# Altium PCB bdcmc25_revised.PcbDoc (part 2 of 4)
Units mil, origin at the board's own origin, x right, y up, seen from the top; angles counter-clockwise.
Board outline 7000 x 2750 mil, 4 copper layers (Top Layer, Layer 2 (GND), Layer 3 (GND), Bottom Layer), stack 23.756 mil thick; 347 components, 158 nets, 1046 pads, 1117 vias.
Unrouted connection lines stored in the file: 6.
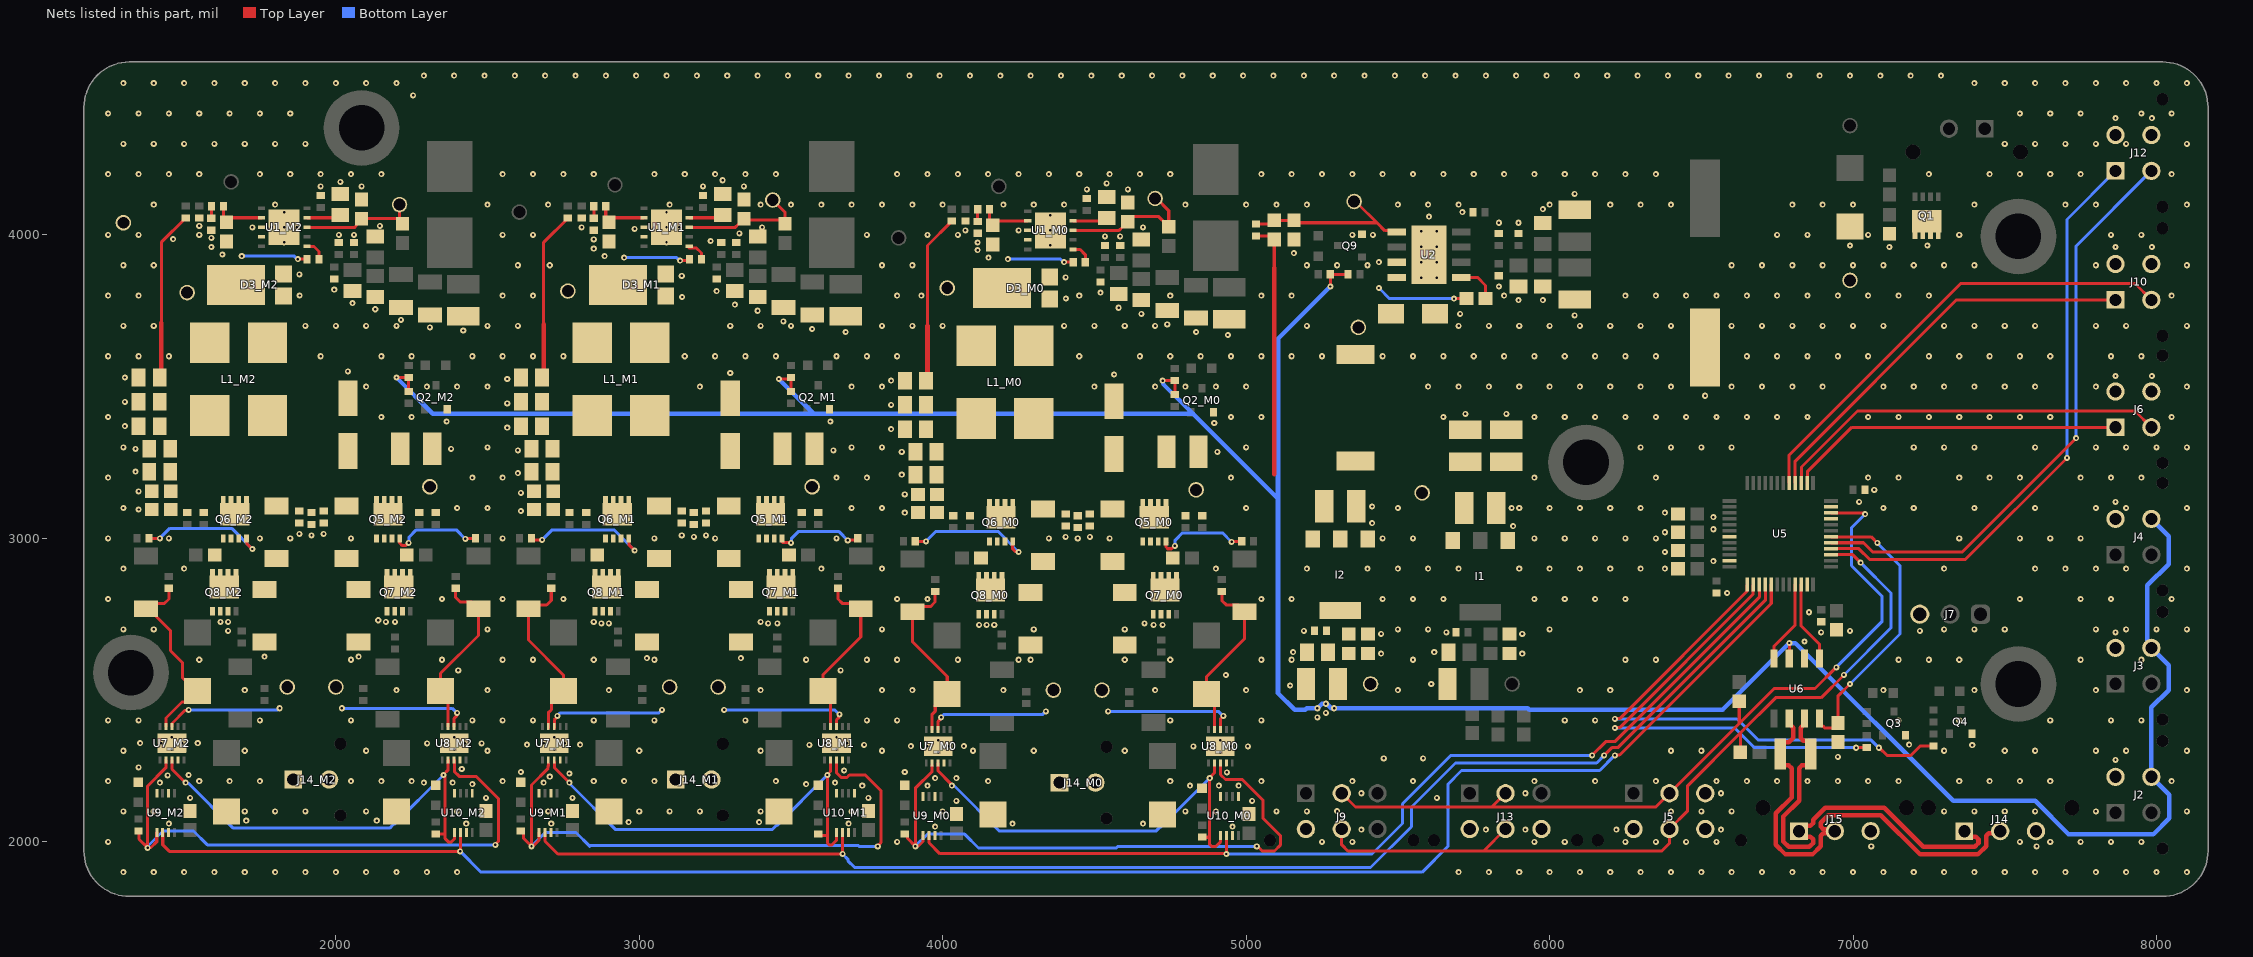
[diagram p4: the nets of this part, all layers, seen from the top]

## Part data
3V3 5V 7V GND GND TP3_M0 TP3_M1 TP3_M2 TP8 TP8 TP8_M2 TP9 TP9 TP9_M2 VBAT: library part TEST-POINT-0001, "Oranange PC Test Point, Miniature Phoisphor Bronze Silver Plating Through Hole Mounting Type"
C1: library part CAP-100U-0001, "CAP ALUM 100UF 20% 100V SMD", Capacitance="100 uF", Voltage=100V, ComponentLink1Description=Datasheet, ComponentLink1URL=https://industrial.panasonic.com/cdbs/www-data/pdf/RDE0000/ABA0000C1190.pdf, Device Class=Electrolytic
C2 C9_M0 C9_M1 C9_M2 C16_M0 C16_M1 C16_M2 C33: library part CAP-10U-0002, "CAP CER 10UF 50V X7R 1210", Capacitance="10 uF", Voltage=50V, ComponentLink1Description=Datasheet, ComponentLink1URL=https://mm.digikey.com/Volume0/opasdata/d220001/medias/docus/41/CL32B106KBJNNNE_Spec.pdf, Device Class=Ceramic, Size=1210
C3 C10_M0 C10_M1 C10_M2 C17_M0 C17_M1 C17_M2 C56_M0 C56_M1 C56_M2 C57_M0 C57_M1 C57_M2: library part CAP-1U-0001, "CAP CER 1UF 50V X7R 0805", Capacitance="1.0 uF", Voltage="50 V", ComponentLink2Description=Datasheet, ComponentLink2URL=https://www.yageo.com/upload/media/product/productsearch/datasheet/mlcc/UPY-GPHC_X7R_6.3V-to-250V_24.pdf, Device Class=Ceramic, Size=0805
C4 C11_M0 C11_M1 C11_M2 C18_M0 C18_M1 C18_M2: library part CAP-0.1U-0002, "CAP CER 0.1UF 50V X7R 0805", Capacitance="100 nF", Voltage Rating="50 V", ComponentLink2Description=Datasheet, ComponentLink2URL=https://www.yageo.com/upload/media/product/productsearch/datasheet/mlcc/UPY-GPHC_X7R_6.3V-to-250V_24.pdf, Device Class=Ceramic, Size=0805
C5 C12_M0 C12_M1 C12_M2 C19_M0 C19_M1 C19_M2: library part CAP-10N-0001, "CAP CER 10000PF 50V C0G/NP0 0805", Capacitance=10nF, Voltage=50V, ComponentLink1Description=Datasheet, ComponentLink1URL=https://search.murata.co.jp/Ceramy/image/img/A01X/G101/ENG/GRM2195C1H103JA01-01.pdf, Device Class=Ceramic, Size=0805
C6 C15_M0 C15_M1 C15_M2 C20_M0 C20_M1 C20_M2 C62_M0 C62_M1 C62_M2 C63_M0 C63_M1 C63_M2: library part CAP-1N-0001, "CAP CER 1000PF 50V X7R 0402", Capacitance="1.0 nF", Voltage="50 V", ComponentLink2Description=Datasheet, ComponentLink2URL=http://www.yageo.com/documents/recent/UPY-GP_NP0_16V-to-50V_16.pdf, Device Class=Ceramic, Size=0402
C7 C13_M0 C13_M1 C13_M2 C21_M0 C21_M1 C21_M2: library part CAP-100P-0001, "CAP CER 100PF 50V C0G/NPO 0402", Capacitance="100 pF", Voltage=50V, ComponentLink1Description=Datasheet, ComponentLink1URL=https://www.yageo.com/upload/media/product/productsearch/datasheet/mlcc/UPY-GP_NP0_16V-to-50V_18.pdf, Device Class=Ceramic, Size=0402
C8 C14_M0 C14_M1 C14_M2 C22_M0 C22_M1 C22_M2: library part CAP-10P-0001, "CAP CER 10PF 50V C0G/NPO 0402", Capacitance="10 pF", Voltage=50V, ComponentLink1Description=Datasheet, ComponentLink1URL=https://www.yageo.com/upload/media/product/productsearch/datasheet/mlcc/UPY-GP_NP0_16V-to-50V_18.pdf, Device Class=Ceramic, Size=0402
C23_M0 C23_M1 C23_M2 C32 C40 C48 C49 C50: library part CAP-0.1U-0001, "CAP CER 0.1UF 16V X7R 0402", Capacitance="100 nF", Voltage Rating="16 V", ComponentLink2Description=Datasheet, ComponentLink2URL=https://www.yageo.com/upload/media/product/productsearch/datasheet/mlcc/UPY-GPHC_X7R_6.3V-to-250V_24.pdf, Device Class=Ceramic, Size=0402
C24_M0 C24_M1 C24_M2 C25_M0 C25_M1 C25_M2: library part CAP-2.2U-0001, "CAP CER 2.2UF 100V X7R 1206", Capacitance=2.2uF, Voltage=100V, ComponentLink1Description=Datasheet, ComponentLink1URL=https://www.yageo.com/upload/media/product/productsearch/datasheet/mlcc/UPY-GPHC_X7R_6.3V-to-250V_24.pdf, Device Class=Ceramic, Size=1206
C26_M0 C26_M1 C26_M2: library part CAP-47U-0001, "CAP ALUM POLY 47UF 20% 16V SMD", Capacitance="47 uF", Voltage=16V, ComponentLink1Description=Datasheet, ComponentLink1URL=https://industrial.panasonic.com/cdbs/www-data/pdf/AAB8000/AAB8000C175.pdf, Device Class=Electrolytic
C27_M0 C27_M1 C27_M2: library part CAP-2.7N-0001, "CAP CER 2700PF 50V C0G/NP0 0805", Capacitance=2.7nF, Voltage=50V, ComponentLink1Description=Datasheet, ComponentLink1URL=https://search.murata.co.jp/Ceramy/image/img/A01X/G101/ENG/GRM2165C1H272JA01-01.pdf, Device Class=Ceramic, Size=0805
C28_M0 C28_M1 C28_M2: library part CAP-6.8P-0001, "CAP CER 6.8PF 100V C0G/NPO 0603", Capacitance=6.8pF, Voltage=100V, ComponentLink1Description=Datasheet, ComponentLink1URL=https://www.yageo.com/upload/media/product/productsearch/datasheet/mlcc/UPY-GPHC_X7R_6.3V-to-250V_24.pdf, Device Class=Ceramic, Size=0603
C29_M0 C29_M1 C29_M2: library part CAP-510P-0001, "CAP CER 510PF 50V C0G/NP0 0402", Capacitance="510 pF", Voltage="50 V", ComponentLink2Description=Datasheet, ComponentLink2URL=https://www.mouser.com/ProductDetail/Walsin/0402N511J500CT?qs=u16ybLDytRbq33ukPPRl4A%3D%3D&srsltid=AfmBOoq1-HCbTRqPV3GtwyI6lHLBf095DSA3Qg1Qkiix4a-obr82TmJ6, Device Class=Ceramic, Size=0402
C30 C35 C42 C60_M0 C60_M1 C60_M2 C61_M0 C61_M1 C61_M2 C64_M0 C64_M1 C64_M2 C65_M0 C65_M1 C65_M2: library part CAP-100N-0001, "CAP CER 0.1UF 100V X7R 0603", Capacitance="100 nF", Voltage="100 V", ComponentLink1Description=Datasheet, ComponentLink1URL=https://www.yageo.com/upload/media/product/app/datasheet/mlcc/upy-np0x7r_mv_100-to-630v.pdf, Device Class=Ceramic, Size=0603
C31 C39: library part CAP-10U-0001, "CAP CER 10UF 10V X5R 0603", Capacitance="10 uF", Voltage=10V, ComponentLink1Description=Datasheet, ComponentLink1URL=https://www.yageo.com/upload/media/product/app/datasheet/mlcc/upy-gphc_x5r_4v-to-50v.pdf, Device Class=Ceramic, Size=0603
C34 C41: library part CAP-470P-0001, "CAP CER 470PF 50V C0G/NPO 0805", Capacitance="470 pF", Voltage=50V, ComponentLink1Description=Datasheet, ComponentLink1URL=https://www.yageo.com/upload/media/product/productsearch/datasheet/mlcc/UPY-GP_NP0_16V-to-50V_18.pdf, Device Class=Ceramic, Size=0805
C36: library part CAP-390P-0001_1, "CAP CER 390PF 50V X7R 0402", Capacitance="390 pF", Voltage=50V, ComponentLink1Description=Datasheet, ComponentLink1URL=https://www.lcsc.com/datasheet/lcsc_datasheet_1912111437_Murata-Electronics-GRM155R71H391KA01D_C185563.pdf, Device Class=Ceramic, Size=0402
C37 C38: library part CAP-68U-0001, "CAP CER 68UF 10V X5R 2220", Capacitance="68 uF", Voltage=10V, ComponentLink1Description=Datasheet, ComponentLink1URL=https://www.lcsc.com/datasheet/lcsc_datasheet_2304140030_TDK-C5750X5R1A686MT000N_C342299.pdf, Device Class=Ceramic, Size=2220
C43 C44 C45 C46: library part CAP-10U-0003, "CAP TANT 10UF 10% 16V 1206", Capacitance="10 uF", Voltage=16V, ComponentLink1Description=Datasheet, ComponentLink1URL=https://www.lcsc.com/datasheet/lcsc_datasheet_2304140030_Vishay-Intertech-293D106X9016A2TE3_C110038.pdf, Device Class=Tantalum, Size=1206
C51: library part CAP-4.7U-0001, "CAP CER 4.7UF 25V X5R 0603", Capacitance="4.7 uF", Voltage=25V, Device Class=Ceramic, Size=0603
C52 C54 C58_M0 C58_M1 C58_M2 C59_M0 C59_M1 C59_M2: library part CAP-10N-0002, "CAP CER 10000PF 50V X7R 0603", Capacitance="10 nF", Voltage="50 V", ComponentLink2Description=Datasheet, ComponentLink2URL=http://www.yageo.com/documents/recent/UPY-GPHC_X7R_6.3V-to-50V_18.pdf, Device Class=Ceramic, Size=0603
C53 C55: library part CAP-1U-0002, "CAP CER 1UF 16V X7R 0603", Capacitance="1.0 uF", Voltage=16V, Device Class=Ceramic, Size=0603
D1: library part DIO-TVS-0001, "TVS DIODE 40VWM 64.5VC DO214AA", Current Rating=9.3A, Voltage Rating=64.5V, ComponentLink1Description=Datasheet, ComponentLink1URL=https://www.littelfuse.com/media?resourcetype=datasheets&itemid=09a6ae9a-73cb-4ac4-acac-e6dab92ab953&filename=littelfuse_tvs_diode_smbj_datasheet.pdf
D2_M0 D2_M1 D2_M2 D4 D5 D18_M0 D18_M1 D18_M2 D19_M0 D19_M1 D19_M2 D21: library part LED-0001, "LED YELLOW CLEAR 0603 SMD", Forward Current=30mA, Forward Voltage=2V, ComponentLink1Description=Datasheet, ComponentLink1URL=https://www.americanbrightled.com/pdffiles/led-components/smt/BL-HKC36G-AV-TRB.pdf
D3_M0 D3_M1 D3_M2: library part DIO-SCHOTTKY-0001, "DIODE SCHOTTKY 60V 7A POWERDI5", Forward Current=7A, Reverse Voltage (DC)=60V, ComponentLink1Description=Datasheet, ComponentLink1URL=https://www.diodes.com/assets/Datasheets/PDS760.pdf
D6_M0 D6_M1 D6_M2 D7_M0 D7_M1 D7_M2 D8_M0 D8_M1 D8_M2 D9_M0 D9_M1 D9_M2 D10_M0 D10_M1 D10_M2 D11_M0 D11_M1 D11_M2 D16_M0 D16_M1 D16_M2 D17_M0 D17_M1 D17_M2: library part DIO-SCHOTTKY-0003, "DIODE SCHOTTKY 60V 3A SOD128", Current Rating=3A, Reverse Voltage=60V, ComponentLink1Description=Datasheet, ComponentLink1URL=https://assets.nexperia.com/documents/data-sheet/PMEG6030EP.pdf
D12_M0 D12_M1 D12_M2 D13_M0 D13_M1 D13_M2 D14_M0 D14_M1 D14_M2 D15_M0 D15_M1 D15_M2: library part DIO-TVS-0002, "TVS DIODE 12VWM 19.9VC DO214AA", Current Rating=30.2A, Standoff Voltage=12V, ComponentLink1Description=Datasheet, ComponentLink1URL=https://www.littelfuse.com/media?resourcetype=datasheets&itemid=09a6ae9a-73cb-4ac4-acac-e6dab92ab953&filename=littelfuse_tvs_diode_smbj_datasheet.pdf
D20: library part DIO-SCHOTTKY-0004, "DIODE SCHOTTKY 200V 1A SMA", Current Rating=1A, Reverse Voltage=200V, ComponentLink1Description=Datasheet, ComponentLink1URL=https://www.digikey.com/en/products/detail/mdd/ss1200/15911596
F1_M0 F1_M1 F1_M2: library part FUSE-0001, "FUSE BLOK CARTRIDGE 125V 10A SMD", Fuse Current=8A, Voltage Rating=125V, ComponentLink2Description=Datasheet, ComponentLink2URL=https://www.littelfuse.com/~/media/electronics/datasheets/fuses/littelfuse_fuse_154_154t_154l_154tl_datasheet.pdf.pdf
F2 F3 F4: library part FUSE-0002, "FUSE BRD MT 250MA 32VAC 32VDC", Fuse Current=250mA, Voltage Rating=32V, ComponentLink2Description=Datasheet, ComponentLink2URL=https://www.littelfuse.com/media?resourcetype=datasheets&itemid=4a59f034-1cca-460e-a5ba-e1e66247c76d&filename=littelfuse_fuse_467_datasheet.pdf
I1: library part IC_LDO_3V3_0001, "IC REG LIN 3.3V 800MA SOT223-4", ComponentLink1Description="New link", ComponentLink1URL=https://www.ti.com/lit/ds/symlink/lm1117.pdf?HQS=dis-dk-null-digikeymode-dsf-pf-null-wwe&ts=1721700739746
I2: library part IC_LDO_5V_0001, "IC REG LINEAR 5V 800MA SOT223-4", ComponentLink1Description=Datasheet, ComponentLink1URL=https://www.ti.com/lit/ds/symlink/lm1117.pdf?HQS=dis-dk-null-digikeymode-dsf-pf-null-wwe&ts=1721700739746
J1: library part CONN-2POS-0002, "CONN HEADER VERT 2POS 3MM", ComponentLink1Description=Datasheet, ComponentLink1URL=https://www.molex.com/content/dam/molex/molex-dot-com/products/automated/en-us/salesdrawingpdf/436/43650/436500215_sd.pdf?inline
J2 J3 J4 J6 J10 J12: library part CONN-4POS-0002, "CONN HEADER VERT 4POS 3MM", ComponentLink1Description=Datasheet, ComponentLink1URL=https://www.molex.com/content/dam/molex/molex-dot-com/products/automated/en-us/salesdrawingpdf/430/43045/430450412_sd.pdf?inline
J5 J9 J13: library part CONN-6POS-0001, "CONN HEADER VERT 6POS 3MM", ComponentLink1Description=Datasheet, ComponentLink1URL=https://tools.molex.com/pdm_docs/ps/PS-43045.pdf
J7: library part CONN-3POS-0001, "CONN HEADER VERT 3POS 2.54MM", Current Rating=3A, Voltage Rating=250V, ComponentLink1Description=Datasheet, ComponentLink1URL=https://www.we-online.com/components/products/datasheet/61300311121.pdf
J14 J15: library part "Micro-Fit Molex 3 Pin Vertical", Package=43650-0315, DeviceName=43650-0315, DeviceSetName=HEADER_POS3_?, GateName_1=G$1, LibraryName=con-molex-micro-fit-3_0_2, SymbolName_1=HEADER_POS3
J14_M0 J14_M1 J14_M2: library part CONN-2POS-0001, "CONN HEADER VERT 2POS", ComponentLink1Description=Datasheet, ComponentLink1URL=https://tools.molex.com/pdm_docs/ps/PS-43045.pdf
L1_M0 L1_M1 L1_M2: library part IND-15U-0002-NoJLC, "SMD MOLDING POWER CHOKE", Current Rating=6A, Inductance=15uH, ComponentLink1Description=Datasheet, ComponentLink1URL=https://www.digikey.com/en/products/detail/codaca/CSAD1010-150M/16633512?s=N4IgjCBcoBwAxVAYygMwIYBsDOBTANCAPZQDaIALHAExwDMEAuoQA4AuUIAymwE4CWAOwDmIAL6Ew1MAE5EIFJAw4CxMiGoy6AdmoUQhajGqa6BjTDp6zhywFY4c23UtOLFbVXPVtYK3e9dODsbdwA2OxgQZhB2Th4BEXFJTQhoBTQsPEISSHITS0do1g5Ibj4hUQkNOBhteTiygFVBfjYAeVQAWVx0bABXXlxzfs4AVoAJcwBbIU4wAMJp9AAPeYDq2hgo9MaQFrbOnr7B4cJRsoBBGbmyuwA6DcIAWmp5RT5%2B1VzyAMYxAFAA
L2: library part IND-15U-0001-NoJLC, "FIXED IND 15UH 3.1A 50 MOHM SMD", Current Rating=3.1A, Inductance=15uH, ComponentLink1Description=Datasheet, ComponentLink1URL=https://www.eaton.com/content/dam/eaton/products/electronic-components/resources/data-sheet/eaton-dr1040-shielded-power-inductors-data-sheet.pdf
Q1: library part NMOS-60A-0001, "MOSFET N-CH 60V 12A/60A 8VSON", Continuous Current=60A, Voltage=60V, ComponentLink2Description=Datasheet, ComponentLink2URL=http://www.ti.com/lit/ds/symlink/csd18543q3a.pdf
Q2_M0 Q2_M1 Q2_M2 Q3 Q4 Q9: library part NMOS-200MA-0001, "MOSFET N-CH 60V 200MA SOT23", Continuous Current=200mA, Voltage=60V, ComponentLink1Description=Datasheet, ComponentLink1URL=https://toshiba.semicon-storage.com/info/T2N7002AK_datasheet_en_20150401.pdf?did=29712&prodName=T2N7002AK
Q5_M0 Q5_M1 Q5_M2 Q6_M0 Q6_M1 Q6_M2 Q7_M0 Q7_M1 Q7_M2 Q8_M0 Q8_M1 Q8_M2: library part NMOS-26A-0001, "MOSFET N-CH 30V 60A 8VSON", Continuous Current=60A, Voltage=30V, ComponentLink1Description=Datasheet, ComponentLink1URL=https://www.ti.com/lit/ds/symlink/csd17575q3.pdf?ts=1728565072242&ref_url=https%253A%252F%252Fwww.mouser.co.uk%252F
R1: library part RES-200k-0001, "RES SMD 200K OHM 1% 1/10W 0603", Power=100mW, Resistance=200k, Tolerance=1%, ComponentLink1Description=Datasheet, ComponentLink1URL=https://www.yageo.com/upload/media/product/products/datasheet/rchip/PYu-RC_Group_51_RoHS_L_12.pdf, Size=0603
R2 R6_M0 R6_M1 R6_M2 R11: library part RES-100k-0001, "RES SMD 100K OHM 1% 1/10W 0603", Power=100mW, Resistance=100k, Tolerance=1%, ComponentLink1Description=Datasheet, ComponentLink1URL=https://www.yageo.com/upload/media/product/products/datasheet/rchip/PYu-RC_Group_51_RoHS_L_12.pdf, Size=0603
R3_M0 R3_M1 R3_M2 R34: library part RES-240-0001, "240R 0.063W 1% 0402 (1005 Metric)  SMD", Power=1/16W, Resistance=240R, Tolerance=1%, ComponentLink1Description=Datasheet, ComponentLink1URL=https://www.yageo.com/upload/media/product/products/datasheet/rchip/PYu-RC_Group_51_RoHS_L_12.pdf, Size=0402
R4_M0 R4_M1 R4_M2: library part RES-2.15M-0001, "RES SMD 2.15M OHM 1% 1/10W 0603", Power=1/10W, Resistance=2.15M, Tolerance=1%, ComponentLink1Description=Datasheet, ComponentLink1URL=https://www.yageo.com/upload/media/product/products/datasheet/rchip/PYu-RC_Group_51_RoHS_L_12.pdf, Size=0603
R5_M0 R5_M1 R5_M2: library part RES-1k-0001, "RES 1K OHM 1% 1/16W 0402", Power=1/16W, Resistance=1k, Tolerance=1%, ComponentLink1Description=Datasheet, ComponentLink1URL=https://www.yageo.com/upload/media/product/products/datasheet/rchip/PYu-RC_Group_51_RoHS_L_12.pdf, Size=0402
R7_M0 R7_M1 R7_M2: library part RES-147k-0001, "RES 147K OHM 1% 1/16W 0402", Power=1/16W, Resistance=147k, Tolerance=1%, ComponentLink1Description=Datasheet, ComponentLink1URL=https://www.yageo.com/upload/media/product/products/datasheet/rchip/PYu-RC_Group_51_RoHS_L_12.pdf, Size=0402
R8_M0 R8_M1 R8_M2: library part RES-59k-0001, "RES 59K OHM 1% 1/16W 0402", Power=1/16W, Resistance=59k, Tolerance=1%, ComponentLink1Description=Datasheet, ComponentLink1URL=https://www.digikey.com/en/products/detail/yageo/RC0402FR-0759KL/2827634?s=N4IgTCBcDaIEoGEAMAWJYBicC0SDsArAJwDSAMiALoC%2BQA, Size=0402
R9_M0 R9_M1 R9_M2: library part RES-178k-0001, "62.5mW Thick Film Resistors 50V ±100ppm/℃ ±1% 178kΩ 0402 Chip Resistor - Surface Mount ROHS", Power=1/16W, Resistance=178k, Tolerance=1%, ComponentLink1Description=Datasheet, ComponentLink1URL=https://www.lcsc.com/datasheet/lcsc_datasheet_2304140030_RALEC-RTT021783FTH_C102842.pdf, Size=0402
R10_M0 R10_M1 R10_M2 R35: library part RES-10.5k-0001, "RES 10.5K OHM 1% 1/16W 0402", Power=1/16W, Resistance=10.5k, Tolerance=1%, ComponentLink1Description=Datasheet, ComponentLink1URL=https://www.yageo.com/upload/media/product/products/datasheet/rchip/PYu-RC_Group_51_RoHS_L_12.pdf, Size=0402
R12: library part RES-43.5k-0001, "RES 45.3K OHM 1% 1/16W 0402", Power=1/16W, Resistance=45.3k, Tolerance=1%, ComponentLink1Description=Datasheet, ComponentLink1URL=https://www.lcsc.com/datasheet/lcsc_datasheet_2304140030_YAGEO-RC0402FR-0745K3L_C137977.pdf, Size=0402
R13: library part RES-12k-0001, "RES 12K OHM 1% 1/10W 0603", Power=1/10W, Resistance=12k, Tolerance=1%, ComponentLink1Description=Datasheet, ComponentLink1URL=https://www.lcsc.com/datasheet/lcsc_datasheet_2304140030_YAGEO-RC0603FR-0712KL_C114659.pdf, Size=0603
R14 R15 R20: library part RES-4.7k-0001, "RES 4.7K OHM 1% 1/10W 0603", Power=1/10W, Resistance=4.7k, Tolerance=1%, ComponentLink1Description=Datasheet, ComponentLink1URL=https://www.yageo.com/upload/media/product/products/datasheet/rchip/PYu-RC_Group_51_RoHS_L_12.pdf, Size=0603
R16 R17: library part RES-470-0001, "RES 470 OHM 1% 1/16W 0402", Power=1/16W, Resistance=470R, Tolerance=1%, ComponentLink1Description=Datasheet, ComponentLink1URL=https://www.yageo.com/upload/media/product/products/datasheet/rchip/PYu-RC_Group_51_RoHS_L_12.pdf, Size=0402
R18 R19 R32_M0 R32_M1 R32_M2 R33_M0 R33_M1 R33_M2: library part RES-100-0001, "RES 100 OHM 1% 1/16W 0402", Power=1/16W, Resistance=100R, Tolerance=1%, ComponentLink1Description=Datasheet, ComponentLink1URL=https://www.yageo.com/upload/media/product/products/datasheet/rchip/PYu-RC_Group_51_RoHS_L_12.pdf, Size=0402
R21: library part RES-120-0001, "RES 120 OHM 1% 1/2W 1210", Power=1/2W, Resistance=120R, Tolerance=1%, ComponentLink1Description=Datasheet, ComponentLink1URL=https://www.yageo.com/upload/media/product/products/datasheet/rchip/PYu-RC_Group_51_RoHS_L_12.pdf, Size=1210
R22_M0 R22_M1 R22_M2 R23_M0 R23_M1 R23_M2 R24_M0 R24_M1 R24_M2 R25_M0 R25_M1 R25_M2 R28_M0 R28_M1 R28_M2 R29_M0 R29_M1 R29_M2 R30_M0 R30_M1 R30_M2 R31_M0 R31_M1 R31_M2: library part RES-33-0001, "RES 33 OHM 1% 1/8W 0402", Power=1/8W, Resistance=33R, Tolerance=1%, ComponentLink1Description=Datasheet, ComponentLink1URL=https://www.yageo.com/upload/media/product/products/datasheet/rchip/PYu-RC_Group_51_RoHS_L_12.pdf, Size=0402
R26_M0 R26_M1 R26_M2 R27_M0 R27_M1 R27_M2: library part RES-1-0001, "RES SMD 1 OHM 5% 1/10W 0402", Power=1/10W, Resistance=1.0R, Tolerance=5%, ComponentLink1Description=Datasheet, ComponentLink1URL=https://api.pim.na.industrial.panasonic.com/file_stream/main/fileversion/1242, Size=0402
U1_M0 U1_M1 U1_M2: library part IC-BUCK-0001, "IC REG BUCK ADJ 5A 10WSON", ComponentLink1Description=Datasheet, ComponentLink1URL=https://www.ti.com/general/docs/suppproductinfo.tsp?distId=10&gotoUrl=https%3A%2F%2Fwww.ti.com%2Flit%2Fgpn%2Ftps54561
U2: library part IC_BUCK_7V_0001, "IC REG BUCK ADJ 2A 8SOPWR", ComponentLink1Description=Datasheet, ComponentLink1URL=https://www.ti.com/general/docs/suppproductinfo.tsp?distId=10&gotoUrl=https%3A%2F%2Fwww.ti.com%2Flit%2Fgpn%2Flmr16020
U5: library part IC-STM32G431CBT6, "IC MCU 32BIT 128KB FLASH 48LQFP", Package=48LQFP, ComponentLink1Description=Datasheet, ComponentLink1URL=https://www.st.com/resource/en/datasheet/stm32g431cb.pdf
U6: library part IC-CAN-0001, "IC TRANSCEIVER 1/1 8SOIC", ComponentLink1Description=Datasheet, ComponentLink1URL=https://www.ti.com/lit/ds/symlink/tcan1044-q1.pdf?HQS=dis-dk-null-digikeymode-dsf-pf-null-wwe&ts=1728758303289&ref_url=https%253A%252F%252Fwww.ti.com%252Fgeneral%252Fdocs%252Fsuppproductinfo.tsp%253FdistId%253D10%2526gotoUrl%253Dhttps%253A%252F%252Fwww.ti.com%252Flit%252Fgpn%252Ftcan1044-q1
U7_M0 U7_M1 U7_M2 U8_M0 U8_M1 U8_M2: library part IC-GTDR-0001, "IC GATE DRVR HALF-BRIDGE 10VSON", Package=10-VSON, ComponentLink1Description=Datasheet, ComponentLink1URL=https://www.ti.com/lit/ds/symlink/ucc27282.pdf?HQS=dis-dk-null-digikeymode-dsf-pf-null-wwe&ts=1728563165008&ref_url=https%253A%252F%252Fwww.ti.com, VCC Max=16
U9_M0 U9_M1 U9_M2 U10_M0 U10_M1 U10_M2: library part IC-MUX-0001, "Multiplexer 1 x 2:1 8-VSSOP", ComponentLink1Description=Datasheet, ComponentLink1URL=https://www.ti.com/general/docs/suppproductinfo.tsp?distId=10&gotoUrl=https%3A%2F%2Fwww.ti.com%2Flit%2Fgpn%2Fsn74lvc2g157

## Free pads (board coordinates)
  round 250 hole 150: ""(1325,2557.5) ""(2085,4352.5) ""(6120,3250) ""(7545,2520) ""(7545,3995)

## Via types
v1: diameter 20, hole 8, Top Layer to Bottom Layer, 1102 vias
v2: diameter 20, hole 7.87, Top Layer to Bottom Layer, 15 vias

## Nets (pads, with @x,y where several pads share a name; then routed paths per layer and width w, separated by ;. In a path a pad name is that pad's centre, name@x,y a point inside that pad or via, vN(x,y) a via of type N, cw(c..) or ccw(c..) an arc to the next point about the centre after c; other vN are vias at no path point)
3V3: 
5V: 5V.1 C39.2 C40.2 C41.2 C42.2 C46.2 I2.2 I2.4 J2.4 J3.4 J4.4 R3_M0.2 R3_M1.2 R3_M2.2 R5_M0.2 R5_M1.2 R5_M2.2 R34.2 R35.2 U6.3 | length 9662.5
  Top Layer w10: v1(2200,3530) R3_M2.2@2240,3530 R5_M2.2@2240,3484.37 ; v1(3460,3525) 3500,3525 R5_M1.2@3500,3484.37 R5_M1.2@3500,3479.37 ; v1(4725,3520) R3_M0.2@4765,3520 R5_M0.2@4765,3474.37 ; v1(5277.59,3830) 5277.43,3830.16 5277.43,3869.84 R34.2@5277.27,3870 R35.2@5327.9,3870 ; U6.3@6790,2603.43 v1(6790,2655)
  Bottom Layer w10: v1(4725,3520) 4726.15,3518.85 4726.15,3508.85
  Bottom Layer w15: v1(2200,3530) 2320,3410 3575,3410 ; v1(3460,3525) 3575,3410 ; 4726.15,3508.85 4825,3410 ; v1(5277.59,3830) 5105,3657.41 5105,3130 ; J4.4@7983.11,3064.06 8040,3007.17 8040,2915 7970,2845 7970,2664.41 7983.11,2651.3 J3.4@7983.11,2639.06 8040,2582.17 8040,2500 7983.11,2443.11 7983.11,2418.74 7982.7,2418.33 7982.7,2316.67 7983.11,2316.26 J2.4@7983.11,2214.06 8042.17,2155 8042.17,2077.17 7990,2025 7710,2025 7600,2135 7330,2135 6810,2655 v1(6790,2655) 6570,2435 5932.64,2435 5927.64,2440 v1(5290,2440) 5289.81,2440.19 5280.08,2440.19 5265.27,2455 5265,2455 5264.81,2454.81 5250.08,2454.81 5235.27,2440 5199.86,2440 5194.86,2435 5160,2435 5105,2490 5105,3130 ; 3575,3410 4825,3410 ; 4825,3410 5105,3130
  other v1: 5235,2410 5262.5,2425 5235,2440 5262.5,2455
7V_Buck: 7V.1 C36.1 C37.2 C38.2 C43.2 C45.2 I1.3 I2.3 L2.2 R11.2 | length 838.4
  Top Layer w10: C36.1@5032.59,3996.81 5080.78,3996.81 R11.2@5092.59,3985 5092.59,3892.41
  Top Layer w15: 5092.59,3211.46 5092.59,3892.41
12V_MOTOR_M0: C16_M0.2 C17_M0.2 C18_M0.2 C19_M0.2 C20_M0.2 C21_M0.2 C22_M0.2 C26_M0.2 C56_M0.2 C57_M0.1 C58_M0.2 C59_M0.1 C62_M0.1 C63_M0.2 D8_M0.2 D9_M0.2 L1_M0.2 Q5_M0.3 Q6_M0.3 R7_M0.2 R26_M0.2 R27_M0.2 TP3_M0.1 | length 534.4
  Top Layer w10: 3950,3700 3950,3965.32 R7_M0.2@4030,4045.32
  Top Layer w15: C17_M0.2@3950,3544.05 3950,3700
12V_MOTOR_M1: C16_M1.2 C17_M1.2 C18_M1.2 C19_M1.2 C20_M1.2 C21_M1.2 C22_M1.2 C26_M1.2 C56_M1.2 C57_M1.1 C58_M1.2 C59_M1.1 C62_M1.1 C63_M1.2 D8_M1.2 D9_M1.2 L1_M1.2 Q5_M1.3 Q6_M1.3 R7_M1.2 R26_M1.2 R27_M1.2 TP3_M1.1 | length 539.4
  Top Layer w10: 2685,3705 2685,3975.32 R7_M1.2@2765,4055.32
  Top Layer w15: C17_M1.2@2685,3549.05 2685,3705
12V_MOTOR_M2: C16_M2.2 C17_M2.2 C18_M2.2 C19_M2.2 C20_M2.2 C21_M2.2 C22_M2.2 C26_M2.2 C56_M2.2 C57_M2.1 C58_M2.2 C59_M2.1 C62_M2.1 C63_M2.2 D8_M2.2 D9_M2.2 L1_M2.2 Q5_M2.3 Q6_M2.3 R7_M2.2 R26_M2.2 R27_M2.2 TP3_M2.1 | length 534.4
  Top Layer w10: 1425,3710 1425,3975.32 R7_M2.2@1505,4055.32
  Top Layer w15: C17_M2.2@1425,3554.05 1425,3710
CAN_N: J14.P$2 J15.P$2 R21.2 U6.6 | length 1529.2
  Top Layer w15: U6.6@6790,2406.57 6790,2388.86 6802.5,2376.36 6802.5,2342.19 6788.71,2328.4 6771,2328.4 6759.8,2317.2 R21.2@6759.8,2290 6759.8,2262.8 6771,2251.6 6788.71,2251.6 6797.5,2242.81 6797.5,2146.01 6745.23,2093.74 6745.23,1990.55 6777.44,1958.34 6866.34,1958.34 6893.44,1985.45 6893.44,2019.57 6902.23,2028.35 6933.35,2028.35 J15.P$2@6940,2035 6933.35,2041.65 6902.23,2041.65 6893.44,2050.43 6893.44,2062.86 6918.2,2087.62 7091.92,2087.62 7221.2,1958.34 7411.34,1958.34 7438.44,1985.45 7438.44,2019.57 7447.23,2028.35 7478.35,2028.35 J14.P$2@7485,2035
CAN_P: J14.P$1 J15.P$1 R21.1 U6.7 | length 1428.2
  Top Layer w15: U6.7@6840,2406.57 6840,2388.86 6827.5,2376.36 6827.5,2342.18 6836.29,2333.4 6849,2333.4 6860.2,2322.2 R21.1@6860.2,2290 6860.2,2262.8 6849,2251.6 6831.29,2251.6 6822.5,2242.82 6822.5,2135.65 6770.23,2083.38 6770.23,2000.91 6787.8,1983.34 6855.98,1983.34 6868.44,1995.8 6868.44,2008.23 6859.66,2017.01 6839.88,2017.01 J15.P$1@6821.89,2035 6839.88,2052.99 6859.66,2052.99 6868.44,2061.77 6868.44,2073.22 6907.85,2112.62 7102.27,2112.62 7231.56,1983.34 7400.98,1983.34 7413.44,1995.8 7413.44,2008.23 7404.66,2017.01 7354.88,2017.01 J14.P$1@7351.89,2020
CAN_RX_LED: R17.2 U5.25 | length 1744.6
  Top Layer w10: v1(6215,2405) 6215.93,2405.93 6230.93,2405.93 6650.73,2825.73 6650.73,2846.68 U5.25@6651.73,2847.68 ; v1(7085,2310) 7086.62,2310 7111.62,2285 7190.71,2285 7220.87,2315.16 7264.84,2315.16 R17.2@7265,2315.32
  Bottom Layer w10: v1(6215,2405) 6618.35,2405 6688.35,2335 7060,2335 v1(7085,2310)
CAN_STB: R20.1 U5.42 U6.8 | length 960.9
  Top Layer w10: U6.8@6890,2406.57 6890,2388.86 6896.81,2382.05 6899.76,2382.05 6906.81,2375 6933.5,2375 R20.1@6950,2391.5 6950,2480 v1(6990,2520) ; U5.42@6927.4,3005.08 U5.42@6927.32,3005.16 7059.84,3005.16 v1(7080,2985)
  Bottom Layer w10: v1(6990,2520) 7155,2685 7155,2910 v1(7080,2985)
CAN_TX_LED: R16.2 U5.26 | length 1527.6
  Top Layer w10: v1(6215,2375) 6216.15,2376.15 6231.15,2376.15 6670.42,2815.42 6670.42,2846.68 U5.26@6671.42,2847.68 ; v1(7010,2310) 7010.16,2310.16 7044.84,2310.16 R16.2@7045,2310.32
  Bottom Layer w10: v1(6215,2375) 6610,2375 6675,2310 v1(7010,2310)
DIR_1_IN_M0: R32_M0.1 U7_M0.7 U8_M0.8 U9_M0.5 | length 2040.3
  Top Layer w10: R32_M0.1@3875,2025.32 3881.27,2025.32 3883.78,2022.8 3883.78,2011.22 v1(3910,1985) ; U9_M0.5@3935,2020.08 3934.92,2020 3934.92,2000.78 3920.29,1986.15 3911.15,1986.15 v1(3910,1985) ; U7_M0.7@3965.32,2253.07 3965.32,2231.96 3910,2176.65 v1(3910,1985) ; U8_M0.8@4915.63,2259.88 4915.63,2221.2 4931.83,2205 4987.53,2205 5055,2137.53 5055,2078.07 5113.7,2019.37 5113.7,1990.41 5093.25,1969.96 5052.75,1969.96 5037.71,1985 v1(5035,1985)
  Bottom Layer w10: v1(3910,1985) 3950,2025 4072.53,2025 4117.84,1979.68 4572.41,1979.68 4577.73,1985 v1(5035,1985)
DIR_1_IN_M1: R32_M1.1 U7_M1.7 U8_M1.8 U9_M1.5 | length 2002.1
  Top Layer w10: R32_M1.1@2616.81,2037.13 2618.78,2035.16 2618.78,2011.22 v1(2645,1985) 2646.15,1986.15 2651.15,1986.15 2670,2005 U9_M1.5@2670,2030.08 ; v1@2644.68,1985.32 2644.68,2187.21 2700,2242.53 2700,2249.43 2700.35,2249.79 2700.35,2258.07 ; U8_M1.8@3650,2264.88 3650.63,2264.88 3650.63,2226.84 3665.47,2212 3684.53,2212 3692.53,2220 3745,2220 3796.65,2168.35 3796.65,1997.28 3786,1986.62 v1(3786,1985)
  Bottom Layer w10: v1(2645,1985) 2690.32,2030.32 2791.4,2030.32 2836.72,1985 2839.4,1987.68 3721.94,1987.68 3724.63,1985 v1(3786,1985)
DIR_1_IN_M2: R32_M2.1 U7_M2.7 U8_M2.8 U9_M2.5 | length 2019.2
  Top Layer w10: R32_M2.1@1350,2035.32 1351.5,2033.82 1351.5,2008.5 v1(1380,1980) ; U9_M2.5@1410,2030.08 1410,2000 1391.15,1981.15 1381.15,1981.15 v1(1380,1980) ; U7_M2.7@1440.32,2269.88 1440.04,2269.61 1440.04,2243.59 1380,2183.55 v1(1380,1980) ; U8_M2.8@2390,2269.88 2390.63,2269.88 2390.63,2231.84 2406.72,2215.76 2461.77,2215.76 2536.65,2140.87 2536.65,2002.28 2526,1991.62 v1(2526,1990)
  Bottom Layer w10: v1(1380,1980) 1381.15,1981.15 1381.15,1986.15 1430.32,2035.32 1531.4,2035.32 1576.72,1990 v1(2526,1990)
DIR_2_IN_M0: R33_M0.1 U7_M0.8 U8_M0.7 U10_M0.5 | length 1435.7
  Top Layer w10: U7_M0.8@3985,2259.88 3985,2233.07 v1@4027,2191.07 ; R33_M0.1@4855,2015.32 4855.31,2015 4880,2015 ; U8_M0.7@4895.31,2259.88 4895.35,2259.84 4895.35,2226.98 4880,2211.62 v1(4880,2210) 4880,2015 ; U10_M0.5@4915,2020.08 4914.92,2020 4914.92,1998.9 4901.02,1985 4885.86,1985 4880,1990.86 4880,2015
  Bottom Layer w10: v1(4030,2185) 4031.15,2183.85 4038.67,2183.85 4187.53,2035 4702.47,2035 4715.47,2048 4718,2048 v1(4880,2210)
DIR_2_IN_M1: R33_M1.1 U7_M1.8 U8_M1.7 U10_M1.5 | length 1441.3
  Top Layer w10: U7_M1.8@2720,2263.07 2720,2245 v1(2770,2195) ; R33_M1.1@3590,2020.32 3620.32,2020.32 ; U8_M1.7@3630.32,2264.88 3630.63,2264.88 3630.63,2256.6 3630.35,2256.32 3630.35,2231.98 3620,2221.62 v1(3620,2220) 3620.32,2219.68 3620.32,2020.32 ; U10_M1.5@3650,2030.08 3650,2005 3634.47,1989.47 3626.18,1989.47 3620.32,1995.32 3620.32,2020.32
  Bottom Layer w10: v1@2770,2193.38 v1(2770,2195) ; v1@2773.67,2188.85 2922.53,2040 3437.47,2040 3450.47,2053 3453,2053 v1(3620,2220)
DIR_2_IN_M2: R33_M2.1 U7_M2.8 U8_M2.7 U10_M2.5 | length 1436.1
  Top Layer w10: U7_M2.8@1460,2269.88 1460,2239.52 v1@1504.76,2194.76 ; R33_M2.1@2330,2025.32 2360.32,2025.32 ; U8_M2.7@2370.32,2269.88 2370.63,2269.88 2370.63,2261.6 2370.35,2261.32 2370.35,2236.98 2355,2221.62 v1(2355,2220) 2355,2218.38 2360.32,2213.05 2360.32,2025.32 ; U10_M2.5@2390.63,2030 2390.55,2029.92 2390.55,2009.53 2381.02,2000 2370.65,2000 2360.32,2010.32 2360.32,2025.32
  Bottom Layer w10: v1(1505,2195) 1506.15,2193.85 1513.67,2193.85 1662.53,2045 2177.47,2045 2190.47,2058 2193,2058 v1(2355,2220)
EN_M0: EN_M0.1 R4_M0.1 R6_M0.2 U1_M0.3 | length 463.9
  Top Layer w10: U1_M0.3@4429.8,4015 4581.5,4015 4592.36,4025.87 4593.35,4025.87 4610,4042.52 R6_M0.2@4610,4043.5 4626.5,4060 4712.48,4060 4738,4034.48 4745,4027.48 R4_M0.1@4745,4026.5 4745,4080 4705,4120 EN_M0.1@4700,4120
EN_M1: EN_M1.1 R4_M1.1 R6_M1.2 U1_M1.3 | length 426.6
  Top Layer w10: U1_M1.3@3164.8,4025 3316.5,4025 3327.36,4035.87 3328.35,4035.87 3345,4052.52 R6_M1.2@3345,4053.5 ; R6_M1.2@3345,4048.5 R4_M1.1@3463.35,4048.5 ; EN_M1.1@3440,4115 3480,4075 R4_M1.1@3480,4036.5 3480,4037.48 R4_M1.1@3466.16,4051.32
EN_M2: EN_M2.1 R4_M2.1 R6_M2.2 U1_M2.3 | length 390.9
  Top Layer w10: U1_M2.3@1904.8,4025 2062.49,4025 2068.35,4030.86 2068.35,4036.85 R6_M2.2@2085,4053.5 2203.35,4053.5 R4_M2.1@2210,4046.85 ; EN_M2.1@2210,4100 R4_M2.1@2210,4046.85 ; R4_M2.1@2220,4036.5 2210,4046.5 R4_M2.1@2210,4046.85
FDCAN_RX: U5.33 U6.4 | length 272.9
  Top Layer w10: U6.4@6740,2603.43 6740,2645 6809.21,2714.21 U5.33@6809.21,2847.68
FDCAN_TX: U5.34 U6.1 | length 269.6
  Top Layer w10: U5.34@6828.9,2847.68 6828.9,2711.1 6890,2650 U6.1@6890,2603.43
GND: C1.1 C2.1 C3.1 C4.1 C5.1 C6.1 C7.1 C8.1 C9_M0.1 C9_M1.1 C9_M2.1 C10_M0.1 C10_M1.1 C10_M2.1 C11_M0.1 C11_M1.1 C11_M2.1 C12_M0.1 C12_M1.1 C12_M2.1 C13_M0.1 C13_M1.1 C13_M2.1 C14_M0.1 C14_M1.1 C14_M2.1 C15_M0.1 C15_M1.1 C15_M2.1 C16_M0.1 C16_M1.1 C16_M2.1 C17_M0.1 C17_M1.1 C17_M2.1 C18_M0.1 C18_M1.1 C18_M2.1 C19_M0.1 C19_M1.1 C19_M2.1 C20_M0.1 C20_M1.1 C20_M2.1 C21_M0.1 C21_M1.1 C21_M2.1 C22_M0.1 C22_M1.1 C22_M2.1 C24_M0.1 C24_M1.1 C24_M2.1 C25_M0.1 C25_M1.1 C25_M2.1 C26_M0.1 C26_M1.1 C26_M2.1 C27_M0.1 C27_M1.1 C27_M2.1 C28_M0.1 C28_M1.1 C28_M2.1 C29_M0.1 C29_M1.1 C29_M2.1 C31.1 C32.1 C33.1 C34.1 C35.1 C37.1 C38.1 C39.1 C40.1 C41.1 C42.1 C43.1 C44.1 C45.1 C46.1 C48.1 C49.1 C50.1 C51.1 C52.1 C53.1 C54.1 C55.1 C56_M0.1 C56_M1.1 C56_M2.1 C57_M0.2 C57_M1.2 C57_M2.2 C58_M0.1 C58_M1.1 C58_M2.1 C59_M0.2 C59_M1.2 C59_M2.2 C64_M0.2 C64_M1.2 C64_M2.2 C65_M0.2 C65_M1.2 C65_M2.2 D1.2 D3_M0.1 D3_M1.1 D3_M2.1 D12_M0.1 D12_M1.1 D12_M2.1 D15_M0.1 D15_M1.1 D15_M2.1 D16_M0.1 D16_M1.1 D16_M2.1 D17_M0.1 D17_M1.1 D17_M2.1 D18_M0.2 D18_M1.2 D18_M2.2 D19_M0.2 D19_M1.2 D19_M2.2 D20.1 GND.1@1300,4040 GND.1@6990,3850 I1.1 I2.1 J2.2 J3.2 J4.2 J5.3 J5.4 J5.6 J6.2 J6.4 J7.3 J9.4 J10.2 J10.4 J12.2 J12.4 J13.4 J13.6 J14.P$3 J15.P$3 Q1.3 Q2_M0.2 Q2_M1.2 Q2_M2.2 Q3.2 Q4.2 Q7_M0.2 Q7_M1.2 Q7_M2.2 Q8_M0.2 Q8_M1.2 Q8_M2.2 Q9.2 R2.2 R6_M0.1 R6_M1.1 R6_M2.1 R9_M0.1 R9_M1.1 R9_M2.1 R10_M0.1 R10_M1.1 R10_M2.1 R12.1 R13.1 R20.2 U1_M0.8 U1_M0.11 U1_M1.8 U1_M1.11 U1_M2.8 U1_M2.11 U2.7 U2.9 U5.19 U5.23 U5.35 U5.45 U5.47 U6.2 U7_M0.9 U7_M0.11 U7_M1.9 U7_M1.11 U7_M2.9 U7_M2.11 U8_M0.9 U8_M0.11 U8_M1.9 U8_M1.11 U8_M2.9 U8_M2.11 U9_M0.2 U9_M0.4 U9_M0.7 U9_M1.2 U9_M1.4 U9_M1.7 U9_M2.2 U9_M2.4 U9_M2.7 U10_M0.1 U10_M0.4 U10_M0.7 U10_M1.1 U10_M1.4 U10_M1.7 U10_M2.1 U10_M2.4 U10_M2.7
  other v1: 1300,1900 1400,1900 1500,1900 1600,1900 1700,1900 1800,1900 1900,1900 2000,1900 2100,1900 2200,1900 2300,1900 2400,1900 5700,1900 5800,1900 5900,1900 6000,1900 6100,1900 6200,1900 6300,1900 6400,1900 6500,1900 6600,1900 6700,1900 6800,1900 6900,1900 7000,1900 7100,1900 7200,1900 7300,1900 7400,1900 7500,1900 7600,1900 7700,1900 7800,1900 7900,1900 8000,1900 8100,1900 7060,1985 7605,1985 1250,2000 3850,2000 5250,2000 5350,2000 5950,2000 6050,2000 6250,2000 6350,2000 6450,2000 6550,2000 7550,2000 7650,2000 7750,2000 7850,2000 7950,2000 5380,2040 5790,2040 5920,2040 6220,2040 6565,2040 3975,2050 4955,2050 1450,2060 2430,2060 2710,2060 3690,2060 4230,2060 4660,2060 2965,2065 3395,2065 1705,2070 2135,2070 1300,2100 1400,2100 1700,2100 1800,2100 1900,2100 2100,2100 2400,2100 2700,2100 3000,2100 3100,2100 3200,2100 3400,2100 3700,2100 4000,2100 4800,2100 4900,2100 5100,2100 5200,2100 6400,2100 6500,2100 6600,2100 7300,2100 7400,2100 7500,2100 7600,2100 7800,2100 8100,2100 5300,2101.01 4045,2135 5020,2135 1520,2145 2495,2145 2780,2145 3755,2145 5628.46,2144.64 5380,2160 5920,2160 6565,2160 3735,2185 3950,2185 4815,2185 4910,2185 4975,2185 2450,2190 3550,2190 1420,2195 2290,2195 2385,2195 2685,2195 3645,2195 1250,2200 1550,2200 1650,2200 1750,2200 2050,2200 2150,2200 2250,2200 2550,2200 2850,2200 2950,2200 3050,2200 3450,2200 4150,2200 4750,2200 5050,2200 5350,2200 5550,2200 5950,2200 6150,2200 6350,2200 6550,2200 6650,2200 6750,2200 6850,2200 6950,2200 7050,2200 7150,2200 7350,2200 7450,2200 7550,2200 7650,2200 8050,2200 3975,2210 4045,2210 2705,2215 1446.04,2218.96 1515,2220 2770,2225 4936.46,2228.66 2610,2230 3875,2230 3675,2235 2415,2240 1350,2245 7865,2270 5453.46,2274.64 5583.46,2274.64 6950,2280 1300,2300 1700,2300 2100,2300 2500,2300 3000,2300 3400,2300 3800,2300 4100,2300 4300,2300 4600,2300 6400,2300 6500,2300 7300,2300 7500,2300 7600,2300 7800,2300 7900,2300 8100,2300 4825.83,2314.43 5005.83,2314.43 3895,2315 4070,2315 3560.83,2319.43 3740.83,2319.43 7392.85,2318.54 2630,2320 2805,2320 7185,2320 2300.83,2324.43 2480.83,2324.43 1355,2325 1545,2325 1250,2400 1350,2400 1750,2400 2050,2400 2450,2400 2550,2400 2650,2400 2850,2400 3050,2400 3350,2400 3750,2400 3850,2400 4750,2400 5050,2400 6050,2400 6150,2400 7150,2400 7350,2400 7650,2400 7850,2400 7950,2400 1700,2500 2200,2500 2500,2500 2900,2500 3400,2500 3800,2500 3900,2500 4200,2500 4700,2500 5000,2500 5500,2500 6100,2500 6200,2500 7100,2500 7400,2500 7800,2500 8100,2500 5145,2515 5610,2520 4933.46,2549.64 2403.46,2564.64 3663.46,2564.64 1550,2600 2050,2600 2350,2600 2550,2600 2650,2600 2850,2600 3050,2600 3550,2600 3750,2600 3850,2600 4050,2600 4250,2600 4290,2600 4600,2600 4750,2600 5050,2600 5150,2600 5550,2600 6250,2600 6350,2600 7150,2600 7250,2600 7350,2600 7750,2600 7950,2600 3025,2605 3335,2605 1765,2610 2075,2610 5445,2620 5910,2620 5155,2625 5620,2625 6840,2660 5445,2685 5910,2685 5660,2690 6895,2690 7865,2690 1645,2695 5190,2695 6990,2695 7220,2695 1300,2700 1400,2700 2500,2700 3800,2700 4300,2700 4600,2700 5500,2700 5600,2700 6000,2700 7300,2700 7400,2700 7500,2700 7800,2700 7900,2700 8000,2700 8100,2700 4120,2715 4145,2715 4170,2715 4695,2715 4725,2715 2875,2720 2900,2720 3425,2720 3455,2720 4665,2720 1620,2725 1645,2725 2165,2725 2195,2725 2850,2725 3400,2725 2140,2730 6855,2756.34 1250,2800 2350,2800 2550,2800 2750,2800 3850,2800 3950,2800 5050,2800 5150,2800 5450,2800 5550,2800 5650,2800 5950,2800 6050,2800 6150,2800 6250,2800 7550,2800 7750,2800 7850,2800 8050,2800 6585,2820 1300,2900 1500,2900 3600,2900 3800,2900 4900,2900 5200,2900 5400,2900 5500,2900 5600,2900 5700,2900 5900,2900 6000,2900 6100,2900 6200,2900 6300,2900 6380,2900 7300,2900 7600,2900 7700,2900 7800,2900 7900,2900 8100,2900 6540,2925 6380,2955 1250,3000 1450,3000 1750,3000 1850,3000 2050,3000 2550,3000 3050,3000 3250,3000 3650,3000 4350,3000 4445,3000 4550,3000 5450,3000 5550,3000 5950,3000 6050,3000 6150,3000 6250,3000 6350,3000 7350,3000 7550,3000 7650,3000 7750,3000 3180,3005 4405,3005 4485,3005 1920,3010 3140,3010 3220,3010 1880,3015 1960,3015 6380,3020 6540,3030 5880,3040 5415,3050 6540,3070 3875,3085 6380,3085 2610,3090 1350,3095 1300,3100 2400,3100 2500,3100 3700,3100 3800,3100 5000,3100 5500,3100 5875,3100 5900,3100 6000,3100 6100,3100 6200,3100 6300,3100 7100,3100 7200,3100 7400,3100 7600,3100 7800,3100 7900,3100 8100,3100 5415,3105 7020,3120 7865,3120 3875,3145 2610,3150 1350,3155 7070,3160 1250,3200 2450,3200 2550,3200 3650,3200 3750,3200 4950,3200 5950,3200 6350,3200 7050,3200 7150,3200 7350,3200 7450,3200 7550,3200 7750,3200 7850,3200 7950,3200 3865,3210 2600,3215 1340,3220 3865,3285 4905,3285 2600,3290 3640,3290 1340,3295 2380,3295 1300,3300 2500,3300 3700,3300 3800,3300 5000,3300 6300,3300 6400,3300 6500,3300 6600,3300 7200,3300 7300,3300 7400,3300 7600,3300 7800,3300 7900,3300 8000,3300 8100,3300 3830,3360 2565,3365 1305,3370 4895,3380 2365,3385 3630,3385 1250,3400 2150,3400 2250,3400 4950,3400 5050,3400 5650,3400 5950,3400 6050,3400 6150,3400 6250,3400 6350,3400 6450,3400 6550,3400 6650,3400 6750,3400 6850,3400 7050,3400 7150,3400 7250,3400 7350,3400 7450,3400 7550,3400 7650,3400 8050,3400 5722.59,3410 5857.59,3410 3830,3440 2565,3445 1305,3450 6512.59,3470 2100,3500 2300,3500 2400,3500 2500,3500 3200,3500 3700,3500 3800,3500 4500,3500 4700,3500 4800,3500 4900,3500 5000,3500 5600,3500 5700,3500 5800,3500 5900,3500 6000,3500 6100,3500 6200,3500 6300,3500 6400,3500 6600,3500 6700,3500 6800,3500 6900,3500 7100,3500 7200,3500 7300,3500 7400,3500 7500,3500 7600,3500 7800,3500 8100,3500 3830,3520 2565,3525 1305,3530 7865,3535 7985,3535 4565,3540 3300,3545 2040,3550 1250,3600 1350,3600 1450,3600 1950,3600 2150,3600 2250,3600 2450,3600 2550,3600 2650,3600 2750,3600 3150,3600 3250,3600 3350,3600 3450,3600 3650,3600 3750,3600 3850,3600 4450,3600 4650,3600 4750,3600 4850,3600 4950,3600 5050,3600 5150,3600 5250,3600 5450,3600 5550,3600 5650,3600 5750,3600 5850,3600 5950,3600 6050,3600 6150,3600 6250,3600 6350,3600 6650,3600 6750,3600 6850,3600 6950,3600 7050,3600 7250,3600 7350,3600 7450,3600 7550,3600 7650,3600 7850,3600 7950,3600 4940,3670 3680,3680 4835,3680 2420,3685 3570,3690 2310,3695 1300,3700 1400,3700 1900,3700 2000,3700 2100,3700 2200,3700 2500,3700 2600,3700 3300,3700 3400,3700 3500,3700 3800,3700 3900,3700 4000,3700 4400,3700 4500,3700 4600,3700 4700,3700 5200,3700 5700,3700 5800,3700 5900,3700 6000,3700 6100,3700 6200,3700 6300,3700 6400,3700 6600,3700 6700,3700 6800,3700 6900,3700 7000,3700 7100,3700 7300,3700 7400,3700 7500,3700 7600,3700 7800,3700 7900,3700 8100,3700 4740,3705 3475,3715 2215,3720 6082.59,3735 4655,3740 5705,3740 3390,3750 2130,3755 4580,3760 3315,3770 2055,3775 5897.59,3785 5977.59,3785 4406.04,3790.29 3141.04,3795.29 1250,3800 1350,3800 1881.04,3800.29 2550,3800 2650,3800 3850,3800 3930,3800 4450,3800 4750,3800 5050,3800 5150,3800 5850,3800 6250,3800 6350,3800 6450,3800 6550,3800 6650,3800 6750,3800 6850,3800 6950,3800 7050,3800 7150,3800 7250,3800 8050,3800 4520,3809.68 3255,3814.68 1995,3819.68 5832.59,3830 4405,3860 3140,3865 1880,3870 1300,3900 1400,3900 2600,3900 2705,3900 3800,3900 3900,3900 5200,3900 5300,3900 5400,3900 6600,3900 6700,3900 6800,3900 6900,3900 7000,3900 7100,3900 7200,3900 7300,3900 7400,3900 7800,3900 8100,3900 5437.59,3910 4151.04,3925.29 2886.04,3930.29 1626.04,3935.29 5157.59,3940 4115,3950 2850,3955 1590,3960 7120,3960 7865,3960 7985,3960 6990,3965 7245,3965 4115,3975 3235,3980 2850,3985 1463.98,3986.02 1590,3990 4535,3995 4585,3995 1250,4000 1350,4000 1550,4000 2010,4000 2060,4000 2550,4000 2650,4000 3750,4000 3950,4000 4050,4000 5350,4000 5417.59,4000 6750,4000 6850,4000 7050,4000 7350,4000 7850,4000 7950,4000 3330,4005 4075,4015 4250,4015 2985,4020 1725,4025 2810,4025 3405,4025 4660,4025 1550,4030 2145,4030 5832.59,4040 5897.59,4040 5602.59,4060 5712.59,4075 5977.59,4085 1400,4100 1800,4100 2500,4100 2700,4100 3100,4100 3400,4100 3500,4100 3600,4100 3700,4100 3800,4100 3900,4100 4000,4100 4200,4100 4300,4100 4400,4100 4800,4100 5000,4100 5100,4100 5200,4100 5500,4100 5600,4100 5700,4100 6000,4100 6200,4100 6300,4100 6400,4100 6800,4100 6900,4100 7000,4100 7400,4100 7700,4100 7800,4100 8100,4100 6082.59,4135 4475,4150 4610,4150 1950,4160 2085,4160 3210,4160 3345,4160 4540,4170 2015,4175 3275,4180 1250,4200 1350,4200 1450,4200 1550,4200 1750,4200 1850,4200 1950,4200 2050,4200 2150,4200 2550,4200 2650,4200 2750,4200 2850,4200 3050,4200 3150,4200 3250,4200 3350,4200 3450,4200 3850,4200 3950,4200 4050,4200 4150,4200 4250,4200 4350,4200 4450,4200 4550,4200 4650,4200 4750,4200 5050,4200 5150,4200 5250,4200 5350,4200 5450,4200 5550,4200 5650,4200 5750,4200 5850,4200 5950,4200 6050,4200 6150,4200 6250,4200 6350,4200 7250,4200 7450,4200 7550,4200 7650,4200 7750,4200 8050,4200 1300,4300 1400,4300 1500,4300 1600,4300 1700,4300 1800,4300 1900,4300 7500,4300 7600,4300 7700,4300 7800,4300 7900,4300 8100,4300 7865,4385 7985,4385 1250,4400 1350,4400 1450,4400 1550,4400 1650,4400 1750,4400 1850,4400 7550,4400 7650,4400 7750,4400 7950,4400 8050,4400 2255,4460 1300,4500 1400,4500 1500,4500 1600,4500 1700,4500 1800,4500 1900,4500 2000,4500 2100,4500 2200,4500 7400,4500 7500,4500 7600,4500 7700,4500 7800,4500 7900,4500 8000,4500 8100,4500 2290,4525 2390,4525 2490,4525 2590,4525 2690,4525 2790,4525 2890,4525 2990,4525 3090,4525 3190,4525 3290,4525 3390,4525 3490,4525 3590,4525 3690,4525 3790,4525 3890,4525 3990,4525 4090,4525 4190,4525 4290,4525 4390,4525 4490,4525 4590,4525 4690,4525 4790,4525 4890,4525 4990,4525 5090,4525 5190,4525 5290,4525 5390,4525 5490,4525 5590,4525 5690,4525 5790,4525 5890,4525 5990,4525 6090,4525 6190,4525 6290,4525 6390,4525 6490,4525 6590,4525 6690,4525 6790,4525 6890,4525 6990,4525 7090,4525 7190,4525 7290,4525
  other v2: 4355,3965.79 1830,3975.79 3090,3975.79 4313.66,4015 4355,4015 4396.34,4015 1788.66,4025 1830,4025 1871.34,4025 3048.66,4025 3090,4025 3131.34,4025 4355,4064.21 1830,4074.21 3090,4074.21
HO_1G_M0: D6_M0.2 D13_M0.2 R22_M0.1 U7_M0.4 | length 581.5
  Top Layer w10: U7_M0.4@3965.32,2370.12 3965.32,2420.32 3975.51,2430.51 3975.51,2450.51 3980,2455 3982.8,2455 D13_M0.2@4015,2487.2 4015,2545 3900,2660 D6_M0.2@3900,2758.39 3916.61,2775 3960,2775 3975,2790 R22_M0.1@3975,2825.32
HO_1G_M1: D6_M1.2 D13_M1.2 R22_M1.1 U7_M1.4 | length 581.5
  Top Layer w10: U7_M1.4@2700.32,2375.12 2700.32,2425.32 2710.51,2435.51 2710.51,2455.51 2715,2460 2717.8,2460 2750,2492.2 2750,2550 2635,2665 2635,2763.39 2651.61,2780 2695,2780 2710,2795 R22_M1.1@2710,2830.32
HO_1G_M2: D6_M2.2 D13_M2.2 R22_M2.1 U7_M2.4 | length 628
  Top Layer w10: U7_M2.4@1440.32,2380.12 1440.32,2408.01 1493.15,2460.84 1505.51,2460.84 1535,2490.33 D13_M2.2@1535,2502.2 ; R22_M2.1@1450,2835.32 1450,2800 1435,2785 1391.61,2785 D6_M2.2@1375,2768.39 1382.44,2768.39 1455,2695.83 1455,2630 1495.51,2589.49 1495.51,2539.72 D13_M2.2@1533.03,2502.2
HO_1M_M0: Q6_M0.1 R23_M0.2 | length 429.7
  Top Layer w10: R23_M0.2@3909.68,2990 v1(3945,2990) ; Q6_M0.1@4230.71,2989.53 4230.71,2965.71 4240.27,2956.15 4248.85,2956.15 v1(4250,2955)
  Bottom Layer w10: v1(3945,2990) 3978,3023 4182,3023 v1(4250,2955)
HO_1M_M1: Q6_M1.1 R23_M1.2 | length 429.7
  Top Layer w10: R23_M1.2@2644.68,2995 v1(2680,2995) ; Q6_M1.1@2965.71,2999.53 2965.71,2979.29 v1(2985,2960)
  Bottom Layer w10: v1(2680,2995) 2713,3028 2917,3028 v1(2985,2960)
HO_1M_M2: Q6_M2.1 R23_M2.2 | length 424.7
  Top Layer w10: R23_M2.2@1384.68,3000 v1(1420,3000) ; Q6_M2.1@1705.71,2999.53 1705.71,2984.29 v1(1725,2965)
  Bottom Layer w10: v1(1420,3000) 1453,3033 1657,3033 v1(1725,2965)
HO_2G_M0: D7_M0.2 D14_M0.2 R25_M0.1 U8_M0.4 | length 571
  Top Layer w10: U8_M0.4@4895.31,2370.12 4895.31,2461.89 D14_M0.2@4870,2487.2 4870,2545 4995,2670 D7_M0.2@4995,2758.39 4972.44,2780.94 4934.06,2780.94 4920,2795 R25_M0.1@4920,2825.32
HO_2G_M1: D7_M1.2 D14_M1.2 R25_M1.1 U8_M1.4 | length 566
  Top Layer w10: U8_M1.4@3630.32,2380.12 3630.32,2466.89 3605,2492.2 3605,2550 3730,2675 3730,2763.39 3707.44,2785.94 3669.06,2785.94 3655,2800 R25_M1.1@3655,2830.32
HO_2G_M2: D7_M2.2 D14_M2.2 R25_M2.1 U8_M2.4 | length 571
  Top Layer w10: U8_M2.4@2370.32,2380.12 2370.32,2471.89 D14_M2.2@2345,2497.2 2345,2555 2470,2680 D7_M2.2@2470,2768.39 2447.44,2790.94 2409.06,2790.94 2395,2805 R25_M2.1@2395,2835.32
HO_2M_M0: Q5_M0.1 R24_M0.1 | length 319.4
  Top Layer w10: Q5_M0.1@4738.66,2986.58 Q5_M0.1@4735.71,2989.53 4735.71,2971.51 4741.57,2965.65 4754.03,2965.65 4763.38,2975 v1(4765,2975) ; v1(4952.08,2988.09) 4953.03,2989.04 4984.36,2989.04 R24_M0.1@4985.31,2990
  Bottom Layer w10: v1(4765,2975) 4766.15,2976.15 4766.15,2993.67 4790.47,3018 4922.17,3018 v1(4952.08,2988.09)
HO_2M_M1: Q5_M1.1 R24_M1.1 | length 293.3
  Top Layer w10: Q5_M1.1@3470.71,2994.53 3470.71,2988.62 3473.59,2985.75 3499.25,2985.75 v1(3500,2985) ; v1(3687.08,2993.09) 3688.03,2994.04 3719.36,2994.04 R24_M1.1@3720.32,2995
  Bottom Layer w10: v1(3500,2985) 3501.15,2986.15 3501.15,2998.67 3525.47,3023 3657.17,3023 v1(3687.08,2993.09)
HO_2M_M2: Q5_M2.1 R24_M2.1 | length 320
  Top Layer w10: Q5_M2.1@2210.71,2993.62 Q5_M2.1@2210.71,2999.53 2210,2998.82 2210,2985 2219.35,2975.65 2229.03,2975.65 2238.38,2985 v1(2240,2985) ; v1(2427.08,2998.09) 2428.03,2999.04 2459.36,2999.04 R24_M2.1@2460.32,3000
  Bottom Layer w10: v1(2240,2985) 2241.15,2986.15 2241.15,3003.67 2265.47,3028 2397.17,3028 v1(2427.08,2998.09)
I2C1_SCL: J5.5 J9.5 J13.5 R15.2 U5.39 | length 2781.3
  Top Layer w10: J9.5@5315,2041.89 5315,1990 5335.2,1969.8 5782.91,1969.8 ; J13.5@5855,2041.89 5782.91,1969.8 ; R15.2@6628.5,2295 6628.5,2358.5 ; U5.39@6927.32,2946.1 6998.9,2946.1 v1(7025,2920) ; v1(6970,2550) 6895,2475 6745,2475 6628.5,2358.5 ; 5782.91,1969.8 6369.8,1969.8 6395,1995 J5.5@6395,2041.89 6455,2101.89 6455,2185 6628.5,2358.5
  Bottom Layer w10: v1(6970,2550) 7125,2705 7125,2820 v1(7025,2920)
I2C1_SDA: J5.2 J9.2 J13.2 R14.2 U5.46 | length 2718.1
  Top Layer w10: J9.2@5315,2160 5360.12,2114.88 5809.88,2114.88 ; J13.2@5855,2160 5809.88,2114.88 ; R14.2@6625,2463.5 6625,2390 ; U5.46@6927.32,3083.9 7034.48,3083.9 7038.38,3080 v1(7040,3080) ; v1(6945,2575) 6875,2505 6740,2505 6625,2390 ; 5809.88,2114.88 6349.88,2114.88 J5.2@6395,2160 6625,2390
  Bottom Layer w10: v1(6945,2575) 7095,2725 7095,2810 6995,2910 6995,3035 v1(7040,3080)
LIMIT_0_A: J6.1@7865,3365.94 U5.2 | length 1113.7
  Top Layer w10: U5.2@6848.58,3182.32 6849.58,3183.32 6849.58,3219.58 6995.94,3365.94 J6.1@7865,3365.94
LIMIT_0_B: J6.3 U5.3 | length 1305.3
  Top Layer w10: U5.3@6828.9,3182.32 6829.9,3183.32 6829.9,3234.9 7015,3420 7929.05,3420 J6.3@7983.11,3365.94
LIMIT_1_A: J10.1@7865,3785.94 U5.4 | length 1347.9
  Top Layer w10: U5.4@6809.21,3182.32 6809.21,3254.21 7340.94,3785.94 J10.1@7865,3785.94
LIMIT_1_B: J10.3 U5.5 | length 1542.4
  Top Layer w10: U5.5@6789.53,3182.32 6789.53,3274.53 7355,3840 7929.05,3840 J10.3@7983.11,3785.94
LIMIT_2_A: J12.1@7865,4210.94 U5.40 | length 1943.5
  Top Layer w10: U5.40@6927.32,2965.79 7019.21,2965.79 7055,2930 7370,2930 v1(7705,3265)
  Bottom Layer w10: v1(7705,3265) 7705,4050.94 J12.1@7865,4210.94
LIMIT_2_B: J12.3 U5.41 | length 1959.3
  Top Layer w10: U5.41@6927.32,2985.47 7034.53,2985.47 7065,2955 7360,2955 v1(7735,3330)
  Bottom Layer w10: v1(7735,3330) 7735,3962.83 J12.3@7983.11,4210.94
M+_M0: C60_M0.1 C60_M1.1 C60_M2.1 D8_M0.1 D8_M1.1 D8_M2.1 D16_M0.2 D16_M1.2 D16_M2.2 J14_M0.1@4385,2195 J14_M1.1@3120,2205 J14_M2.1@1860,2205 Q6_M0.2 Q6_M1.2 Q6_M2.2 Q8_M0.3 Q8_M1.3 Q8_M2.3 TP8.1 TP8_M2. U7_M0.3 U7_M1.3 U7_M2.3 | length 1180.2
  Top Layer w10: U7_M2.3@1460,2380.12 1460,2390 1503.09,2433.09 1513.09,2433.09 v1(1515,2435) ; U7_M1.3@2720,2375.12 2720,2401.93 2728.85,2410.78 2728.85,2413.85 v1(2730,2415) ; U7_M0.3@3985,2370.12 3985,2396.93 3993.85,2405.78 3993.85,2408.85 v1(3995,2410)
  Bottom Layer w10: v1(1515,2435) 1807.29,2435 1812.29,2440 v1(1815,2440) ; v1(2730,2415) 2740,2425 3065,2425 v1(3075,2435) ; v1(3995,2410) 4005,2420 4330,2420 v1(4340,2430)
M-_M0: C61_M0.1 C61_M1.1 C61_M2.1 D9_M0.1 D9_M1.1 D9_M2.1 D17_M0.2 D17_M1.2 D17_M2.2 J14_M0.2 J14_M1.2 J14_M2.2 Q5_M0.2 Q5_M1.2 Q5_M2.2 Q7_M0.3 Q7_M1.3 Q7_M2.3 TP9.1 TP9_M2.1 U8_M0.3 U8_M1.3 U8_M2.3 | length 1304.1
  Top Layer w10: U8_M2.3@2390,2380.12 2390,2406.93 2398.85,2415.78 2398.85,2423.85 v1(2400,2425) ; U8_M1.3@3650,2375.12 3650,2401.93 3658.85,2410.78 3658.85,2418.85 v1(3660,2420) ; U8_M0.3@4915,2370.12 4915,2405 v1(4925,2415)
  Bottom Layer w10: v1(2020,2440) 2383.38,2440 2398.38,2425 v1(2400,2425) ; v1(3280,2435) 3643.38,2435 3658.38,2420 v1(3660,2420) ; v1(4545,2430) 4908.38,2430 v1@4923.38,2415
MOTOR_DIR_M0: U5.27 U9_M0.6 U10_M0.6 | length 3260.3
  Top Layer w10: U9_M0.6@3954.68,2020.08 3954.68,1996.94 3990.78,1960.84 4933.84,1960.84 v1(4935,1959.68) ; v1@4934.69,1965 U10_M0.6@4934.69,2020.08 ; v1(6140,2285) 6185,2330 6215,2330 6691.1,2806.1 U5.27@6691.1,2847.68
  Bottom Layer w10: v1(4935,1959.68) 4935.32,1960 5415,1960 5515,2060 5515,2125 5675,2285 v1(6140,2285)
MOTOR_DIR_M1: U5.28 U9_M1.6 U10_M1.6 | length 4613.2
  Top Layer w10: U9_M1.6@2689.68,2030.08 2689.68,2001.94 2731.62,1960 v1(3670,1960) 3670,1996.53 3669.68,1996.84 U10_M1.6@3669.68,2030.08 ; v1(6180,2285) 6205,2310 6225,2310 6710.79,2795.79 U5.28@6710.79,2847.68
  Bottom Layer w10: v1(3670,1960) 3688.71,1941.29 3688.71,1936.29 3710,1915 5410,1915 5545,2050 5545,2115 5690,2260 6155,2260 v1(6180,2285)
MOTOR_DIR_M2: U5.29 U9_M2.6 U10_M2.6 | length 5988.1
  Top Layer w10: U9_M2.6@1429.68,2030.08 1429.76,2030 1429.76,1990.24 1451.41,1968.59 v1(2410,1968.59) ; v1@2410.31,1968.91 U10_M2.6@2410.31,2030 ; v1(6215,2285) 6216.15,2286.15 6231.15,2286.15 6730.47,2785.47 U5.29@6730.47,2847.68
  Bottom Layer w10: v1(2410,1968.59) 2478.59,1900 5580,1900 5665,1985 5665,2190 5710,2235 6165,2235 v1(6215,2285)
NetC23_M0_1: C23_M0.1 U1_M0.1 | length 72.4
  Top Layer w10: U1_M0.1@4429.8,3952.01 4452.99,3952.01 4470,3935 4470,3910.32 C23_M0.1@4469.69,3910
NetC23_M0_2: C23_M0.2 D3_M0.2 L1_M0.1 SW_M0.1 U1_M0.9 | length 219.5
  Top Layer w10: v1(4400,3910) C23_M0.2@4430.31,3910
  Bottom Layer w10: v1(4215,3920) 4388.38,3920 4398.38,3910 v1(4400,3910)
NetC23_M1_1: C23_M1.1 U1_M1.1 | length 72.4